# Altium PCB board.PcbDoc (part 2 of 2)
Units mm, origin at the board's own origin, x right, y up, seen from the top; angles counter-clockwise.
Board outline 50 x 15.5 mm, 4 copper layers (Top Layer, GND, PWR, Bottom Layer), stack 1.522 mm thick; 76 components, 98 nets, 369 pads, 198 vias.
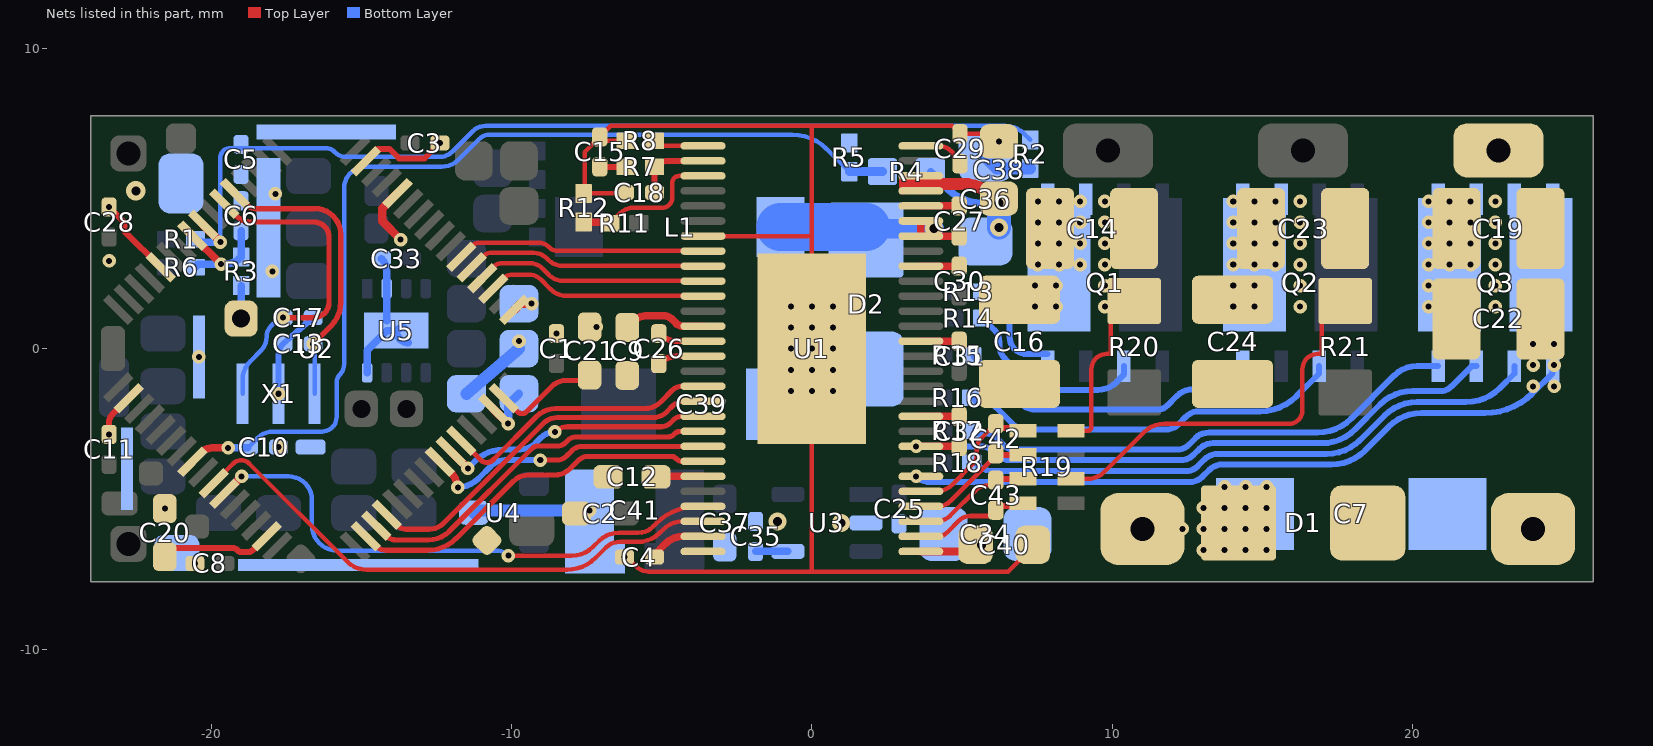
[diagram p4: the nets of this part, all layers, seen from the top]

## Via types
v1: diameter 0.45, hole 0.2, Top Layer to Bottom Layer, tented both sides, 182 vias
v2: diameter 0.6, hole 0.3, Top Layer to Bottom Layer, tented both sides, 6 vias
v3: diameter 0.45, hole 0.2, Top Layer to Bottom Layer, tented bottom, 5 vias
v4: diameter 0.45, hole 0.2, Top Layer to Bottom Layer, tented top, 3 vias
v5: diameter 0.65, hole 0.3, Top Layer to Bottom Layer, 1 vias
v6: diameter 0.45, hole 0.2, Top Layer to Bottom Layer, 1 vias

## Nets (pads, with @x,y where several pads share a name; then routed paths per layer and width w, separated by ;. In a path a pad name is that pad's centre, name@x,y a point inside that pad or via, vN(x,y) a via of type N, cw(c..) or ccw(c..) an arc to the next point about the centre after c; other vN are vias at no path point) (continued)
FET_3PH: C32.1 pad.PH@22.85,6.6 Q3.3 Q3.7 Q3.8 U1.36 | length 21.2
  Top Layer w0.25: U1.36@3.625,-3.25 C32.1@4.9,-3.25
  Bottom Layer w0.2: v1@3.371,-3.25 5.615,-3.25 cw(c5.615,-3.857) 6.044,-3.428 6.147,-3.531 ccw(c6.576,-3.101) 6.576,-3.708 12.284,-3.708 ccw(c12.284,-3.129) 12.694,-3.539 12.903,-3.33 cw(c13.344,-3.771) 13.344,-3.147 16.966,-3.147 ccw(c16.966,-1.57) 18.081,-2.685 18.909,-1.857 cw(c19.988,-2.937) 19.988,-1.41 20.924,-1.41 ccw(c20.924,-0.912) 21.276,-1.264 21.961,-0.58 Q3.3@22.115,-0.58
  other v1: 3.473,-3.25
GND: C1.1 C2.1 C3.1 C4.1 C5.1 C6.1 C7.2 C8.1 C9.1 C10.1 C11.1 C12.1 C13.1 C14.1 C15.1 C16.1 C17.1 C18.1 C19.1 C20.1 C21.1 C22.1 C23.1 C24.1 C25.1 C28.1 C29.1 C33.1 C34.1 C35.1 C36.1 C37.1 C38.1 C39.1 C40.1 C41.1 D1.1 D2.1 pad.7@-9.75,0 pad.7@-10.817,-6.382 pad.7@-11.5,-1.5 pad.7@-16.687,-3.275 pad.7@-21,5.5 pad.7@-21.14,-6.8 pad.9@-7.225,-6.975 pad.10 pad.-@24,-6 Q3.1 R2.2 R5.1 R8.1 R12.1 R19.4 R19.8 R20.1 R21.1 U1.7 U1.28 U1.34 U1.57 U2.12 U2.18 U2.60 U2.63 U3.2 U4.3 U5.2 U5.8 U5.9 X1.2 | length 115.4
  Top Layer w0.15: C4.1@-6.239,-6.858 -5.848,-7.249 ccw(c-5.443,-6.844) -5.443,-7.417 0,-7.417 ; C18.1@-6.239,5.173 -7.569,5.173 -7.569,6.543 C15.1@-7.061,7.051 ; R8.1@-6.191,6.918 -6.739,6.918 cw(c-6.739,7.373) C15.1@-7.061,7.051 ; U1.7@-3.625,3.75 0,3.75 ; v1(0,-1.403) 0,-7.417 ; v1(0,0) v1(0,0.702) v1(0,1.403) 0,3.75 ; v1(6.223,6.901) 5.969,7.155 C29.1@4.928,7.155 4.664,7.418 0,7.418 ; C40.1@7.201,-6.756 6.54,-7.417 0,-7.417 ; R19.4@8.623,-4.337 9.163,-4.337 ccw(c9.163,-3.526) 9.736,-4.099 11.053,-2.783 cw(c11.731,-3.461) 11.731,-2.502 15.878,-2.502 ccw(c15.878,-2.053) 16.327,-2.053 16.327,-0.684 cw(c16.839,-0.684) 16.839,-0.173 16.965,-0.173 16.965,1.346 17.44,1.346 R21.1@17.504,1.41 ; R19.8@8.623,-2.737 9.153,-2.737 ccw(c9.153,-2.587) 9.303,-2.587 9.303,-0.684 cw(c9.815,-0.684) 9.815,-0.173 9.941,-0.173 9.941,1.346 10.416,1.346 R20.1@10.48,1.41 ; C15.1@-7.061,7.051 -6.694,7.418 0,7.418 ; 0,3.75 0,7.418
  Top Layer w0.2: v1(-23.393,-2.864) -23.393,-2.455 cw(c-23.013,-2.455) -23.282,-2.186 U2.18@-22.74,-1.644 ; v1(-23.393,4.712) -22.885,4.204 -22.885,3.911 U2.12@-21.679,2.705 ; U2.63@-14.855,6.24 -14.441,6.655 -14.061,6.655 -13.737,6.331 -12.897,6.331 v1(-12.383,6.845)
  Top Layer w0.28: U2.60@-13.795,5.18 -14.3,4.675 -14.3,4.242 v1(-13.691,3.632)
  Bottom Layer w0.2: v1(-17.75,-1.5) -17.75,-0.199 cw(c-17.238,-0.199) C13.1@-17.6,0.163 C17.1@-16.6,1.037 ; v1(3.473,-4.25) ccw(c3.927,-3.795) 3.927,-4.438 12.586,-4.438 ccw(c12.586,-3.874) 12.985,-4.273 12.996,-4.269 13.227,-4.038 cw(c13.668,-4.479) 13.668,-3.855 17.29,-3.855 ccw(c17.29,-2.279) 18.405,-3.393 19.211,-2.587 cw(c20.29,-3.667) 20.29,-2.14 22.409,-2.14 ccw(c22.409,0.076) 23.976,-1.491 24.655,-0.812 Q3.1@24.655,-0.58
  Bottom Layer w0.25: U5.8@-14.805,-0.8 -14.805,-0.055 -14.15,0.6 U5.9@-13.83,0.6 ; C33.1@-14.33,3 cw(c-14.753,2.578) -14.155,2.578 U5.2@-14.155,2 U5.9@-14.155,0.925 ; U5.9@-13.589,0.7 ccw(c-13.589,0.359) U5.9@-13.83,0.6 ; U5.9@-13.43,0.2 cw(c-13.43,0.6) U5.9@-13.83,0.6
  Bottom Layer w0.4: pad.7@-11.5,-1.5 pad.7@-9.75,0 ; U4.3@-11.25,-5.461 -11.174,-5.385 v1(-7.4,-5.385) ; C36.1@5.775,6.366 6.14,6.001 R2.2@7.264,6.001
  other v1: -20.541,-7.15 -6.239,-6.934 -21.539,-5.321 -17.75,-3.275 -0.702,-1.403 0.702,-1.403 24.004,-1.253 24.706,-1.253 -0.702,-0.702 0,-0.702 0.702,-0.702 24.004,-0.551 24.706,-0.551 -20.404,-0.275 -0.702,0 0.702,0 24.004,0.151 24.706,0.151 -9.75,0.25 -8.5,0.5 -0.702,0.702 0.702,0.702 -7.175,0.724 9.75,1.397 16.25,1.397 22.75,1.397 -0.702,1.403 0.702,1.403 9.75,2.098 16.25,2.098 22.75,2.098 -17.962,2.573 9.75,2.8 16.25,2.8 22.75,2.8 -23.393,2.924 9.75,3.502 16.25,3.502 22.75,3.502 9.75,4.203 16.25,4.203 22.75,4.203 9.75,4.905 16.25,4.905 22.75,4.905 -17.856,5.156
  other v2: 0.962,-5.8 -1.138,-5.75
  other v5: -22.5,5.25
NetC4_2: C4.2 U1.27 | length 1.8
  Top Layer w0.25: C4.2@-5.239,-6.858 -4.862,-6.481 cw(c-4.305,-7.037) -4.305,-6.25 U1.27@-3.625,-6.25
NetC9_2: C9.2 U1.13 | length 2.8
  Top Layer w0.25: C9.2@-6.147,0.711 -5.917,0.941 cw(c-5.549,0.574) -5.549,1.094 -4.938,1.094 cw(c-4.938,0.688) -4.651,0.975 -4.536,0.86 ccw(c-4.271,1.124) -4.271,0.75 U1.13@-3.625,0.75
NetC12_2: C12.2 U1.23 | length 1.8
  Top Layer w0.25: C12.2@-5.352,-4.14 -5.242,-4.25 U1.23@-3.625,-4.25
NetC13_2: C13.2 U2.5 X1.1 | length 9.9
  Top Layer w0.18: U2.5@-19.205,5.18 -18.813,4.789 ccw(c-18.514,5.088) -18.514,4.665 -16.545,4.665 cw(c-16.545,3.801) -15.681,3.801 -15.681,1.55 cw(c-16.81,1.55) -16.012,0.752 v1(-16.6,0.163)
  Bottom Layer w0.15: v1(-16.6,0.163) cw(c-16.721,0.043) -16.55,0.043 X1.1@-16.55,-1.5
NetC15_2: C15.2 R7.2 | length 0.9
  Top Layer w0.2: C15.2@-7.061,6.051 R7.2@-6.191,6.051
NetC17_2: C17.2 U2.6 X1.3 | length 11
  Top Layer w0.18: U2.6@-19.558,4.826 -19.123,4.392 ccw(c-18.7,4.815) -18.7,4.216 -16.582,4.216 cw(c-16.582,3.707) -16.074,3.707 -16.074,1.541 cw(c-16.578,1.541) -16.578,1.037 v1(-17.6,1.037)
  Bottom Layer w0.15: X1.3@-18.95,-1.5 -18.95,-1.029 cw(c-18.096,-1.029) -18.7,-0.425 -18.344,-0.069 ccw(c-18.814,0.4) -18.15,0.4 cw(c-17.667,0.4) -18.009,0.741 -17.794,0.956 cw(c-17.6,0.762) v1(-17.6,1.037)
NetC18_2: C18.2 R7.1 U1.2 | length 2.5
  Top Layer w0.203: C18.2@-5.239,5.173 R7.1@-5.239,6.051 cw(c-4.759,5.571) -4.759,6.25 U1.2@-3.625,6.25
NetC20_2: C20.2 U2.31 | length 3.7
  Top Layer w0.2: C20.2@-21.539,-6.82 -21.356,-6.637 -19.271,-6.637 cw(c-19.271,-6.846) -19.123,-6.698 -19.095,-6.727 ccw(c-18.982,-6.614) -18.982,-6.774 -18.788,-6.774 ccw(c-18.788,-6.505) -18.598,-6.695 U2.31@-18.144,-6.24
NetC21_2: C21.2 U2.47 | length 3.6
  Top Layer w0.17: U2.47@-10.259,-1.644 -9.81,-2.093 ccw(c-9.651,-1.935) -9.493,-2.093 -8.649,-1.25 cw(c-8.181,-1.717) -8.181,-1.056 -7.58,-1.056 C21.2@-7.4,-0.876
NetC26_1: C26.1 U1.14 | length 1.5
  Top Layer w0.2: C26.1@-5.098,0.5 ccw(c-4.494,1.104) -4.494,0.25 U1.14@-3.625,0.25
NetC26_2: C26.2 U1.15 | length 1.5
  Top Layer w0.2: C26.2@-5.098,-0.5 cw(c-4.494,-1.104) -4.494,-0.25 U1.15@-3.625,-0.25
NetC27_1: C27.1 D2.2 L1.1 U1.50 U1.51 | length 6.9
  Top Layer w0.25: U1.51@3.625,4.25 U1.50@3.625,3.75 C27.1@4.9,3.75
  Bottom Layer w0.65: D2.2@1.803,4 v2(4.071,4)
  Bottom Layer w1.6: L1.1@-1.05,4.05 D2.2@1.803,4.05
NetC27_2: C27.2 U1.52 | length 1.3
  Top Layer w0.25: U1.52@3.625,4.75 C27.2@4.9,4.75
NetC29_2: C29.2 U1.56 | length 1.6
  Top Layer w0.15: U1.56@3.625,6.75 4.217,6.75 cw(c4.217,6.155) 4.812,6.155 C29.2@4.928,6.155
NetC30_2: C30.2 U1.48 | length 1.3
  Top Layer w0.25: U1.48@3.625,2.75 C30.2@4.9,2.75
NetC31_2: C31.2 U1.43 | length 1.3
  Top Layer w0.25: U1.43@3.625,0.25 C31.2@4.9,0.25
NetC32_2: C32.2 U1.38 | length 1.3
  Top Layer w0.25: U1.38@3.625,-2.25 C32.2@4.9,-2.25
NetC35_2: C35.2 U3.4 | length 1.1
  Bottom Layer w0.25: C35.2@-1.875,-6.75 U3.4@-0.8,-6.75
NetQ1_2: Q1.2 R14.2 | length 6.4
  Bottom Layer w0.2: R14.2@5.676,1.021 6.078,0.619 cw(c5.686,0.228) 6.24,0.228 6.24,0.117 ccw(c6.876,0.117) 6.426,-0.333 7.335,-1.242 ccw(c7.649,-0.927) 7.649,-1.372 9.521,-1.372 ccw(c9.521,-0.506) 10.133,-1.118 10.385,-0.866 Q1.2@10.385,-0.58 Q1.2@10.385,-0.574
NetQ1_4: Q1.4 R13.2 | length 3.8
  Bottom Layer w0.2: R13.2@5.676,1.894 6.183,1.894 cw(c6.183,1.499) 6.579,1.499 6.579,0.396 ccw(c7.15,0.396) 7.15,-0.175 Q1.4@7.845,-0.175
NetQ2_2: Q2.2 R16.2 | length 12.8
  Bottom Layer w0.2: R16.2@5.371,-1.656 5.508,-1.793 5.736,-1.793 cw(c5.736,-2.345) 6.126,-1.955 6.662,-2.491 ccw(c7.148,-2.005) 7.148,-2.692 11.783,-2.692 ccw(c11.783,-2.113) 12.192,-2.523 12.448,-2.267 cw(c12.89,-2.708) 12.89,-2.084 14.922,-2.084 ccw(c14.922,-0.383) 16.125,-1.586 16.885,-0.826 Q2.2@16.885,-0.58
NetQ2_4: Q2.4 R15.2 | length 10.3
  Bottom Layer w0.2: R15.2@5.371,-0.25 6.937,-1.816 ccw(c7.459,-1.295) 7.459,-2.032 11.5,-2.032 ccw(c11.5,-1.578) 11.821,-1.899 12.145,-1.575 cw(c12.684,-2.114) 12.684,-1.352 13.574,-1.352 ccw(c13.574,-0.772) 13.984,-1.182 14.345,-0.821 Q2.4@14.345,-0.58
NetQ3_2: Q3.2 R18.2 | length 19.4
  Bottom Layer w0.2: R18.2@5.422,-3.801 ccw(c6.087,-3.136) 6.087,-4.076 12.436,-4.076 ccw(c12.436,-3.496) 12.846,-3.906 13.069,-3.684 cw(c13.51,-4.125) 13.51,-3.501 17.132,-3.501 ccw(c17.132,-1.924) 18.247,-3.039 19.061,-2.225 cw(c20.14,-3.305) 20.14,-1.778 21.777,-1.778 ccw(c21.777,-0.195) 22.896,-1.314 23.385,-0.826 Q3.2@23.385,-0.58
NetQ3_4: Q3.4 R17.2 | length 16.6
  Bottom Layer w0.2: R17.2@5.422,-2.699 5.544,-2.821 5.768,-2.821 cw(c5.768,-3.372) 6.157,-2.982 6.395,-3.22 ccw(c6.74,-2.875) 6.74,-3.363 12.141,-3.363 ccw(c12.141,-2.783) 12.55,-3.193 12.768,-2.975 cw(c13.209,-3.417) 13.209,-2.792 16.832,-2.792 ccw(c16.832,-1.216) 17.946,-2.331 19.387,-0.89 cw(c20.135,-1.638) 20.135,-0.58 Q3.4@20.845,-0.58
NetR8_2: R8.2 U1.1 | length 1.7
  Top Layer w0.15: R8.2@-5.239,6.918 ccw(c-4.834,7.323) -4.834,6.75 U1.1@-3.625,6.75
NetR11_1: R11.1 R12.2 U1.3 | length 5
  Top Layer w0.15: R11.1@-6.672,4.214 -6.381,4.506 cw(c-5.924,4.049) -5.924,4.695 -4.978,4.695 ccw(c-4.978,5.025) -4.649,5.025 -4.649,5.523 cw(c-4.422,5.523) -4.422,5.75 U1.3@-3.625,5.75
  Top Layer w0.25: R12.2@-7.6,4.214 R11.1@-6.672,4.214
SNS_I1: U1.25 U2.27 | length 18.5
  Top Layer w0.15: v1(-10.105,-6.889) -7.99,-6.889 ccw(c-7.99,-5.891) -7.284,-6.596 -7.087,-6.399 cw(c-6.43,-7.056) -6.43,-6.127 -5.773,-6.127 ccw(c-5.773,-5.447) -5.292,-5.927 -5.182,-5.817 cw(c-3.814,-7.184) -3.814,-5.25 U1.25@-3.625,-5.25
  Top Layer w0.28: U2.27@-19.558,-4.826 v1(-18.984,-4.252)
  Bottom Layer w0.15: v1(-18.984,-4.252) -17.415,-4.252 cw(c-17.415,-5.025) -16.642,-5.025 -16.642,-5.879 ccw(c-15.801,-5.879) -15.801,-6.72 -10.511,-6.72 cw(c-10.511,-7.295) v1(-10.105,-6.889)
SNS_I1N: C42.2 R19.7 U1.33 | length 4.7
  Top Layer w0.15: U1.33@3.625,-4.75 4.131,-4.75 ccw(c4.131,-3.993) 4.666,-4.528 5.363,-3.831 ccw(c5.067,-3.535) 5.486,-3.535 5.486,-3.333 cw(c5.97,-3.333) 5.628,-2.991 C42.2@6.121,-2.497 ccw(c6.269,-2.497) C42.2@6.269,-2.645 ; R19.7@6.931,-2.645 R19.7@7.023,-2.737
  Top Layer w0.2: C42.2@6.269,-2.645 R19.7@6.931,-2.645
SNS_I1P: C42.1 R19.5 U1.32 | length 4.1
  Top Layer w0.15: U1.32@3.625,-5.25 4.182,-5.25 ccw(c4.182,-4.657) 4.601,-5.076 C42.1@6.151,-3.527
  Top Layer w0.2: C42.1@6.121,-3.497 ccw(c6.161,-3.497) 6.161,-3.537 R19.5@7.023,-3.537
SNS_I2: U1.26 U2.26 | length 18.5
  Top Layer w0.15: U2.26@-19.912,-4.473 -19.26,-3.821 cw(c-18.997,-4.084) -18.734,-3.821 -15.458,-7.097 ccw(c-14.834,-6.473) -14.834,-7.356 -8.144,-7.356 ccw(c-8.144,-6.024) -7.203,-6.966 -6.855,-6.618 cw(c-6.405,-7.069) -6.405,-6.431 -5.791,-6.431 ccw(c-5.791,-5.403) -5.063,-6.13 -4.953,-6.02 cw(c-4.302,-6.671) -4.302,-5.75 U1.26@-3.625,-5.75
SNS_I2N: C43.2 R19.3 U1.31 | length 3.9
  Top Layer w0.15: U1.31@3.625,-5.75 4.131,-5.75 ccw(c4.131,-5.075) 4.608,-5.552 5.453,-4.707 cw(c5.834,-5.089) 5.834,-4.55 5.949,-4.55 C43.2@6.121,-4.377
  Top Layer w0.2: C43.2@6.121,-4.377 cw(c6.161,-4.377) 6.161,-4.337 R19.3@7.023,-4.337
SNS_I2P: C43.1 R19.1 U1.30 | length 3.6
  Top Layer w0.15: U1.30@3.625,-6.25 4.185,-6.25 ccw(c4.185,-5.811) 4.496,-6.121 4.891,-5.727 cw(c5.271,-6.107) 5.271,-5.569 5.929,-5.569 C43.1@6.121,-5.377 ; R19.1@6.931,-5.229 R19.1@7.023,-5.137
  Top Layer w0.2: C43.1@6.269,-5.229 R19.1@6.931,-5.229
SPI_CS: U1.8 U2.54 | length 8.3
  Top Layer w0.15: U2.54@-11.673,3.059 -11.313,3.419 cw(c-11.043,3.15) -11.043,3.531 -9.116,3.531 cw(c-9.116,3.005) -8.744,3.377 -8.734,3.367 ccw(c-8.471,3.63) -8.471,3.258 U1.8@-3.633,3.258
SPI_MISO: U1.10 U2.52 | length 7.7
  Top Layer w0.15: U2.52@-10.966,2.351 -10.579,2.739 cw(c-10.324,2.483) -10.324,2.844 -9.397,2.844 cw(c-9.397,2.224) -8.958,2.663 -8.745,2.449 ccw(c-8.282,2.912) -8.282,2.258 U1.10@-3.633,2.258
SPI_MOSI: U1.9 U2.53 | length 8
  Top Layer w0.15: U2.53@-11.32,2.705 -10.956,3.069 cw(c-10.662,2.776) -10.662,3.191 -9.261,3.191 cw(c-9.261,2.582) -8.831,3.012 -8.781,2.962 ccw(c-8.287,3.456) -8.287,2.758 U1.9@-3.633,2.758
SPI_SCK: U1.11 U2.51 | length 7.4
  Top Layer w0.15: U2.51@-10.613,1.998 -10.269,2.342 cw(c-9.964,2.037) -9.964,2.468 -9.421,2.468 cw(c-9.421,1.916) -9.031,2.306 -8.711,1.987 ccw(c-8.159,2.539) -8.159,1.758 U1.11@-3.633,1.758
SWCLK: pad.7@-9.75,1.5 U2.49 | length 0.7
  Top Layer w0.28: U2.49@-9.906,1.291 -9.696,1.5 v3(-9.332,1.5)
SWDIO: pad.7@-9.75,-1.5 U2.46 | length 1.9
  Top Layer w0.28: U2.46@-10.613,-1.998 v3(-10.114,-2.497)
  Bottom Layer w0.28: v3(-10.114,-2.497) -10.114,-1.864 pad.7@-9.75,-1.5
T_DRV: C5.2 R1.2 R2.1 U2.8 | length 32.2
  Top Layer w0.28: U2.8@-20.265,4.119 v1(-19.691,3.545)
  Bottom Layer w0.15: R1.2@-20.524,3.647 R1.2@-20.422,3.545 ; v1(-19.691,3.545) -19.691,6.346 cw(c-19.358,6.346) -19.358,6.679 -19,6.679 -16.183,6.679 cw(c-16.183,6.285) -15.904,6.564 -15.878,6.538 ccw(c-15.51,6.906) -15.51,6.385 -12.385,6.385 ccw(c-12.385,6.968) -11.973,6.556 -11.288,7.242 cw(c-10.861,6.814) -10.861,7.418 6.43,7.418 cw(c6.43,6.528) 7.06,7.158 R2.1@7.264,6.953
  Bottom Layer w0.25: R1.2@-20.422,3.545 v1(-19.691,3.545)
T_MOTOR: C6.2 R3.1 R6.2 U2.9 | length 3.9
  Top Layer w0.25: U2.9@-20.619,3.766 v1(-19.664,2.811)
  Bottom Layer w0.25: R6.2@-20.524,2.709 -20.422,2.811 v1(-19.664,2.811) -19.579,2.811 ccw(c-19.579,3.63) R3.1@-19,3.051 C6.2@-19,3.924
TEMP_SNS_IN: pad.-@-19,1 R3.2 | length 1.1
  Bottom Layer w0.25: pad.-@-19,1 R3.2@-19,2.099
U_H: U1.21 U2.41 | length 9.6
  Top Layer w0.17: v1@-8.992,-3.708 -8.488,-3.708 ccw(c-8.488,-3.256) -8.168,-3.576 -7.987,-3.395 cw(c-7.637,-3.744) -7.637,-3.25 U1.21@-3.625,-3.25
  Top Layer w0.25: U2.41@-12.381,-3.765 -12.001,-4.145 cw(c-12.471,-4.614) v1@-11.807,-4.614
  Bottom Layer w0.2: v1@-11.807,-4.614 ccw(c-11.807,-3.614) -11.099,-4.321 -10.676,-3.898 cw(c-10.219,-4.354) -10.219,-3.708 v1(-9.042,-3.708)
  other v1: -11.781,-4.614
U_L: U1.22 U2.34 | length 12.6
  Top Layer w0.17: U2.34@-14.855,-6.24 -14.535,-6.561 ccw(c-14.174,-6.199) -14.174,-6.71 -12.802,-6.71 ccw(c-12.802,-5.338) -11.832,-6.309 -9.929,-4.405 cw(c-9.448,-4.886) -9.448,-4.206 -8.561,-4.206 ccw(c-8.561,-3.486) -8.051,-3.995 -7.774,-3.719 cw(c-7.461,-4.032) -7.461,-3.589 -4.66,-3.589 cw(c-4.66,-3.762) -4.537,-3.639 -4.504,-3.672 ccw(c-4.316,-3.484) -4.316,-3.75 U1.22@-3.625,-3.75
Ub: C7.1 C14.2 C16.2 C19.2 C22.2 C23.2 C24.2 C34.2 C36.2 C38.2 C40.2 D1.2 pad.+ Q1.5 Q1.6 Q2.5 Q2.6 Q3.5 Q3.6 R4.2 U1.29 U1.53 U1.54 | length 9.2
  Top Layer w0.25: U1.53@3.015,5.25 U1.54@3.015,5.75 ; U1.53@3.625,5.25 U1.54@3.625,5.75
  Top Layer w0.254: U1.29@3.625,-6.75 C40.2@5.29,-6.75
  Top Layer w0.4: 3.141,5.486 5.004,5.486 cw(c5.004,3.984) C38.2@6.066,5.046
  Bottom Layer w0.25: R4.2@3.95,5.89 4.521,5.32 ccw(c5.67,6.469) 5.67,4.843 v2(6.223,4.843)
  Bottom Layer w0.8: v2(6.223,4.031) v2(6.223,4.843)
  other v1: 13.032,-6.702 13.734,-6.702 14.435,-6.702 15.137,-6.702 12.33,-6 13.032,-6 13.734,-6 14.435,-6 15.137,-6 13.032,-5.298 13.734,-5.298 14.435,-5.298 15.137,-5.298 13.734,-4.597 14.435,-4.597 15.137,-4.597 7.423,1.397 8.124,1.397 14.024,1.397 14.726,1.397 20.524,1.397 7.423,2.098 8.124,2.098 14.024,2.098 14.726,2.098 20.524,2.098 7.524,2.8 8.226,2.8 8.928,2.8 14.024,2.8 14.726,2.8 15.428,2.8 20.524,2.8 21.226,2.8 21.928,2.8 7.524,3.502 8.226,3.502 8.928,3.502 14.024,3.502 14.726,3.502 15.428,3.502 20.524,3.502 21.226,3.502 21.928,3.502 7.524,4.203 8.226,4.203 8.928,4.203 14.024,4.203 14.726,4.203 15.428,4.203 20.524,4.203 21.226,4.203 21.928,4.203 7.524,4.905 8.226,4.905 8.928,4.905 14.024,4.905 14.726,4.905 15.428,4.905 20.524,4.905 21.226,4.905 21.928,4.905
  other v2: 5.651,-6.528
V_H: U1.19 U2.42 | length 9.2
  Top Layer w0.17: v1(-8.553,-2.77) cw(c-8.141,-3.182) -8.141,-2.6 -5.01,-2.6 ccw(c-5.01,-2.188) -4.719,-2.479 -4.602,-2.362 cw(c-4.331,-2.633) -4.331,-2.25 U1.19@-3.625,-2.25
  Top Layer w0.28: U2.42@-12.027,-3.412 v1(-11.453,-3.986)
  Bottom Layer w0.2: v1(-11.453,-3.986) -11.213,-3.746 cw(c-10.269,-4.689) -10.269,-3.355 -9.702,-3.355 ccw(c-9.702,-2.65) -9.204,-3.148 -9.02,-2.964 cw(c-8.553,-3.43) v1(-8.553,-2.77)
V_L: U1.20 U2.35 | length 12.4
  Top Layer w0.17: U2.35@-14.502,-5.887 -14.143,-6.245 ccw(c-13.855,-5.958) -13.855,-6.365 -12.758,-6.365 ccw(c-12.758,-5.402) -12.077,-6.083 -9.312,-3.317 cw(c-9.125,-3.504) -9.125,-3.24 -8.479,-3.24 ccw(c-8.479,-2.839) -8.195,-3.123 -8.118,-3.045 cw(c-7.848,-3.315) -7.848,-2.933 -4.781,-2.933 ccw(c-4.781,-2.672) -4.596,-2.857 -4.568,-2.828 cw(c-4.379,-3.017) -4.379,-2.75 U1.20@-3.625,-2.75
VB_SNS: C10.2 R4.1 R5.2 U2.24 | length 32.3
  Top Layer w0.25: U2.24@-20.619,-3.765 -20.283,-3.43 cw(c-19.976,-3.737) -19.976,-3.303 v1(-19.431,-3.303)
  Bottom Layer w0.15: C10.2@-18.778,-3.303 C10.2@-18.75,-3.275 -18.445,-2.97 cw(c-17.931,-3.483) -17.931,-2.757 -16.301,-2.757 ccw(c-16.301,-2.275) -15.82,-2.275 -15.82,-1.126 cw(c-15.438,-1.126) -15.708,-0.856 ccw(c-16.042,-0.522) -15.569,-0.522 -15.569,5.343 cw(c-14.857,5.343) -14.857,6.055 -12.32,6.055 ccw(c-12.32,6.828) -11.774,6.282 -11.082,6.973 cw(c-10.721,6.612) -10.721,7.123 -0.657,7.123 cw(c-0.657,5.496) 0.494,6.646 R5.2@1.25,5.89
  Bottom Layer w0.25: v1(-19.431,-3.303) C10.2@-18.778,-3.303
  Bottom Layer w0.3: R5.2@1.25,5.89 R4.1@2.35,5.89
W_H: U1.17 U2.43 | length 9.3
  Top Layer w0.17: U2.43@-11.673,-3.058 -11.034,-3.698 ccw(c-10.82,-3.484) -10.607,-3.698 -9.168,-2.259 cw(c-8.527,-2.899) -8.527,-1.993 -5.57,-1.993 ccw(c-5.57,-1.232) -5.031,-1.77 -4.637,-1.376 cw(c-4.333,-1.68) -4.333,-1.25 U1.17@-3.625,-1.25
W_L: U1.18 U2.36 | length 12.4
  Top Layer w0.17: U2.36@-14.148,-5.533 -13.781,-5.9 ccw(c-13.516,-5.635) -13.516,-6.01 -12.748,-6.01 ccw(c-12.748,-5.317) -12.259,-5.807 -8.93,-2.478 cw(c-8.487,-2.922) -8.487,-2.295 -5.295,-2.295 ccw(c-5.295,-1.639) -4.831,-2.103 -4.622,-1.893 cw(c-4.276,-2.239) -4.276,-1.75 U1.18@-3.625,-1.75
pads on no net: U1.4 U1.55 U2.7

## Polygon pours and split planes (outlines as drawn)
GND on Bottom Layer "GND_L04_P060" (solid, remove dead copper, pour order 60): -24,7.75 -24,-7.75 26,-7.75 26,7.75
Ub on Bottom Layer "UB_L04_P050" (solid, remove dead copper, pour order 50): 5.309,-9.119 16.459,-9.119 16.459,-4.273 5.309,-4.273
GND on Bottom Layer "GND_L04_P051" (solid, remove dead copper, pour order 51): 23.948,-1.757 cw(c23.948,-1.423) 23.613,-1.423 23.613,-0.241 cw(c24.399,-0.241) 24.399,0.546 24.78,0.546 cw(c24.78,0.17) 25.156,0.17 25.156,-1.392 cw(c24.791,-1.392) 24.791,-1.757
FET_1L_RET on Bottom Layer "FET_1L_RET_L04_P054" (solid, remove dead copper, pour order 54): 10.414,-1.346 10.414,-0.465 cw(c10.976,-0.465) 10.976,0.097 11.936,0.097 cw(c11.936,-0.365) 12.398,-0.365 12.398,-1.072 cw(c11.431,-1.072) 11.431,-2.039 11.107,-2.039 cw(c11.107,-1.346)
FET_2L_RET on Bottom Layer "FET_2L_RET_L04_P052" (solid, remove dead copper, pour order 52): 17.448,-1.757 cw(c17.448,-1.423) 17.113,-1.423 17.113,-0.241 cw(c17.899,-0.241) 17.899,0.546 18.28,0.546 cw(c18.28,0.17) 18.656,0.17 18.656,-1.392 cw(c18.291,-1.392) 18.291,-1.757
FET_1PH on Bottom Layer "FET_1PH_L04_P056" (solid, remove dead copper, pour order 56): 10.65,-1.2 10.65,0.115 12.293,0.115 ccw(c12.293,0.572) 12.75,0.572 12.75,7.75 6.85,7.75 6.85,6.157 ccw(c7.307,6.157) 7.307,5.7 9.093,5.7 cw(c9.093,5.243) 9.55,5.243 9.55,0.957 cw(c9.093,0.957) 9.093,0.5 8.707,0.5 ccw(c8.707,0.043) 8.25,0.043 8.25,-0.9 ccw(c8.55,-0.9) 8.55,-1.2
FET_2PH on Bottom Layer "FET_2PH_L04_P057" (solid, remove dead copper, pour order 57): 17.15,-1.2 17.15,0.115 18.793,0.115 ccw(c18.793,0.572) 19.25,0.572 19.25,7.75 13.35,7.75 13.35,6.157 ccw(c13.807,6.157) 13.807,5.7 15.593,5.7 cw(c15.593,5.243) 16.05,5.243 16.05,0.957 cw(c15.593,0.957) 15.593,0.5 15.207,0.5 ccw(c15.207,0.043) 14.75,0.043 14.75,-0.9 ccw(c15.05,-0.9) 15.05,-1.2
FET_3PH on Bottom Layer "FET_3PH_L04_P059" (solid, remove dead copper, pour order 59): 23.65,-1.2 23.65,0.115 25.293,0.115 ccw(c25.293,0.572) 25.75,0.572 25.75,7.75 19.85,7.75 19.85,6.157 ccw(c20.307,6.157) 20.307,5.7 22.093,5.7 cw(c22.093,5.243) 22.55,5.243 22.55,0.957 cw(c22.093,0.957) 22.093,0.5 21.707,0.5 ccw(c21.707,0.043) 21.25,0.043 21.25,-0.9 ccw(c21.55,-0.9) 21.55,-1.2
GND on Top Layer "GND_L01_P063" (solid, remove dead copper, pour order 63): -24,7.75 -24,-7.75 26,-7.75 26,7.75
Ub on Top Layer "UB_L01_P053" (solid, remove dead copper, pour order 53): 9.246,-9.449 9.246,-5.521 cw(c10.389,-5.521) 9.58,-4.713 11.19,-3.103 cw(c11.998,-3.912) 11.998,-2.769 15.926,-2.769 cw(c15.926,-3.2) 16.358,-3.2 16.358,-9.449
FET_1L_RET on Top Layer "FET_1L_RET_L01_P055" (solid, remove dead copper, pour order 55): 10.236,0.208 cw(c10.46,0.208) 10.46,0.432 10.956,0.432 cw(c10.956,-0.711) 11.764,0.097 11.813,0.049 cw(c11.456,-0.308) 11.96,-0.308 11.96,-1.252 cw(c10.817,-1.252) 11.626,-2.06 11.561,-2.124 10.236,-2.124 10.236,-1.524
Ub on Top Layer "UB_L01_P062" (solid, remove dead copper, pour order 62): 20.833,-0.355 cw(c20.833,-0.173) 20.65,-0.173 20.65,0.508 ccw(c20.284,0.508) 20.543,0.767 cw(c21.265,1.489) 20.244,1.489 20.244,5.309 cw(c20.65,5.309) 20.65,5.715 21.585,5.715 cw(c21.586,5.061) 21.601,5.715 cw(c21.598,5.083) 22.23,5.08 22.23,-0.215 cw(c22.09,-0.215) 22.09,-0.355
Ub on Top Layer "UB_L01_P061" (solid, remove dead copper, pour order 61): 12.852,0.838 cw(c12.852,1.041) 12.649,1.041 12.649,5.055 cw(c13.31,5.055) 13.31,5.715 13.815,5.715 15.06,5.715 cw(c15.06,4.978) 15.796,4.978 15.796,2.845 cw(c15.306,2.845) 15.653,2.498 15.473,2.318 ccw(c15.728,2.063) 15.367,2.063 15.367,1.016 cw(c15.189,1.016) 15.189,0.838
Ub on Top Layer "UB_L01_P058" (solid, remove dead copper, pour order 58): 5.359,1.168 ccw(c5.69,1.168) 5.69,0.838 8.103,0.838 ccw(c8.103,1.092) 8.357,1.092 8.357,1.33 cw(c9.5,1.33) 8.691,2.138 9.051,2.498 ccw(c8.704,2.845) 9.195,2.845 9.195,4.978 ccw(c8.458,4.978) 8.458,5.715 5.969,5.715 ccw(c5.969,5.105) 5.359,5.105
3V3 on PWR (split plane): -0.102,4.623 -0.094,4.497 -0.069,4.373 -0.029,4.253 0.027,4.14 0.097,4.035 0.181,3.94 0.276,3.857 0.381,3.787 0.494,3.731 0.614,3.69 0.738,3.665 0.864,3.657 4.449,3.657 4.454,3.658 4.521,3.65 4.587,3.622 4.645,3.578 4.689,3.521 4.716,3.454 4.725,3.388 4.724,3.382 4.724,3.151 4.725,3.145 4.716,3.079 4.689,3.013 4.645,2.956 4.588,2.912 4.521,2.884 4.455,2.876 4.45,2.877 0.804,2.877 0.686,2.869 0.569,2.846 0.457,2.808 0.351,2.755 0.252,2.69 0.163,2.611 0.085,2.522 0.019,2.424 -0.033,2.318 -0.071,2.205 -0.094,2.089 -0.102,1.971 -0.102,0 -0.102,-7.498 -23.748,-7.498 -23.748,7.498 -0.102,7.498
Ub on PWR (split plane): 25.748,-7.498 0.102,-7.498 0.102,0 0.102,1.971 0.101,1.977 0.109,2.081 0.135,2.188 0.177,2.29 0.235,2.384 0.306,2.468 0.39,2.54 0.484,2.598 0.586,2.64 0.694,2.666 0.798,2.674 0.804,2.673 4.45,2.673 4.45,2.672 4.543,2.682 4.633,2.709 4.716,2.753 4.788,2.813 4.848,2.885 4.892,2.968 4.919,3.057 4.928,3.151 4.928,3.382 4.919,3.476 4.892,3.566 4.848,3.648 4.788,3.721 4.715,3.781 4.632,3.825 4.543,3.852 4.449,3.862 4.449,3.861 0.864,3.861 0.857,3.86 0.744,3.869 0.628,3.897 0.517,3.943 0.415,4.005 0.324,4.083 0.246,4.174 0.183,4.276 0.138,4.387 0.11,4.503 0.101,4.616 0.102,4.623 0.102,7.498 25.748,7.498
GND on GND (split plane): 25.748,-7.498 -23.748,-7.498 -23.748,7.498 25.748,7.498

## Keep-outs
Keep-Out Layer:
  lines w0.05: -24,-7.75 26,-7.75 26,7.75 -24,7.75

## Other copper
Top Layer:
  region net FET_2L_RET: 17.221,-1.549 17.221,0.158 cw(c17.501,0.158) 17.501,0.438 18.238,0.438 cw(c18.238,0.176) 18.501,0.176 18.501,-1.549 17.247,-1.549
  pour cut-out: 8,-3.124 9.253,-3.124 ccw(c9.253,-2.856) 9.52,-2.856 9.52,-0.617 cw(c9.76,-0.617) 9.76,-0.377 10.011,-0.377 ccw(c10.011,-0.193) 10.195,-0.193 10.195,1.222 ccw(c10.018,1.222) 10.018,1.399 cw(c10.018,1.359) 10.058,1.359 10.058,1.118 cw(c9.957,1.118) 9.957,1.016 9.881,1.016 ccw(c9.881,0.838) 9.703,0.838 9.703,0.685 cw(c8.662,0.685) 9.398,-0.051 9.327,-0.122 ccw(c9.89,-0.686) 9.093,-0.686 9.093,-2.184 cw(c8.915,-2.184) 8.915,-2.362 8,-2.362
  pour cut-out: 8,-3.988 8,-4.724 9.347,-4.724 11.405,-2.667 15.871,-2.667 ccw(c15.871,-2.068) 16.47,-2.068 16.47,-0.696 cw(c16.854,-0.696) 16.854,-0.312 17.071,-0.312 ccw(c17.071,-0.185) 17.198,-0.185 17.198,1.035 ccw(c17.062,1.035) 17.062,1.172 16.93,1.172 ccw(c16.93,1.002) 16.76,1.002 16.76,0.712 cw(c15.646,0.712) 16.434,-0.076 16.321,-0.189 ccw(c16.807,-0.675) 16.12,-0.675 16.12,-2.032 cw(c15.86,-2.032) 15.86,-2.291 11.627,-2.291 ccw(c11.627,-3.352) 10.876,-2.602 9.771,-3.707 cw(c9.093,-3.029) 9.093,-3.988
  region net NetC27_1: 2.883,4.266 2.883,3.737 4.363,3.737 4.363,4.267 2.946,4.267
Bottom Layer:
  pour cut-out: 22.795,-2.362 ccw(c22.795,-1.257) 23.577,-2.039 23.577,-1.266 22.153,-1.266 22.153,-1.89 20.204,-1.89 ccw(c20.204,-3.44) 19.108,-2.344 18.367,-3.084 cw(c17.106,-1.823) 17.106,-3.607 13.741,-3.607 ccw(c13.741,-4.54) 13.081,-3.88 12.986,-3.976 cw(c12.466,-3.456) 12.466,-4.191 4.045,-4.191 cw(c4.045,-3.931) 3.861,-4.115 3.715,-3.969 ccw(c3.455,-4.228) 3.454,-3.861 ccw(c3.454,-4.216) 3.099,-4.216 3.099,-4.242 ccw(c3.581,-4.242) 3.581,-4.724 12.548,-4.724 ccw(c12.548,-3.866) 13.155,-4.473 13.31,-4.318 cw(c13.8,-4.808) 13.8,-4.115 17.221,-4.115 ccw(c17.221,-2.153) 18.609,-3.54 19.38,-2.769 cw(c20.361,-3.749) 20.361,-2.362
  region net Ub: 20.215,3.815 20.215,5.486 22.246,5.486 22.246,3.81
  region net Ub: 13.715,3.815 13.715,5.486 15.746,5.486 15.746,3.81
  region net Ub: 7.215,3.815 7.215,5.486 9.246,5.486 9.246,3.81
  region net GND: -12.722,3.596 -12.439,3.596 -12.156,3.879 -12.156,4.162 -13.288,5.294 -13.57,5.294 -13.853,5.011 -13.853,4.728
PWR (plane layer: these items are gaps in the copper):
  lines w0.2: 0,-7.75 0,0 0,1.971 cw(c0.804,1.971) 0.804,2.775 4.45,2.775 ccw(c4.45,3.151) 4.826,3.151 4.826,3.382 ccw(c4.449,3.382) 4.449,3.759 0.864,3.759 cw(c0.864,4.623) 0,4.623 0,7.75

## Silkscreen, mask and mechanical layers (free items; w line width, h text height)
Top Overlay:
  text "+" at 11.267,-3.867 h0.8 r180
  text "-" at 24.267,-3.867 h0.8 r180
Bottom Overlay:
  text "C" at -9.486,2.436 h0.8
  text "D" at -9.486,-3.254 h0.8
  text "+" at 11.267,-4.666 h0.8
  text "-" at 24.267,-4.666 h0.8
BoardShape:
  the board outline again, w0.01